# Altium PCB PCI Express_16765X6890_64PIN_Low profile_Clear.PCBDOC (part 5 of 9)
Units mm, origin at the board's own origin, x right, y up, seen from the top; angles counter-clockwise.
Board outline 80.71 x 137.84 mm, 6 copper layers (Top Layer, Layer 2 (GND), Layer 3, Layer 4, Layer 5 (AGND), Bottom Layer), stack 1.571 mm thick; 507 components, 297 nets, 1544 pads, 616 vias.
Unrouted connection lines stored in the file: 101.
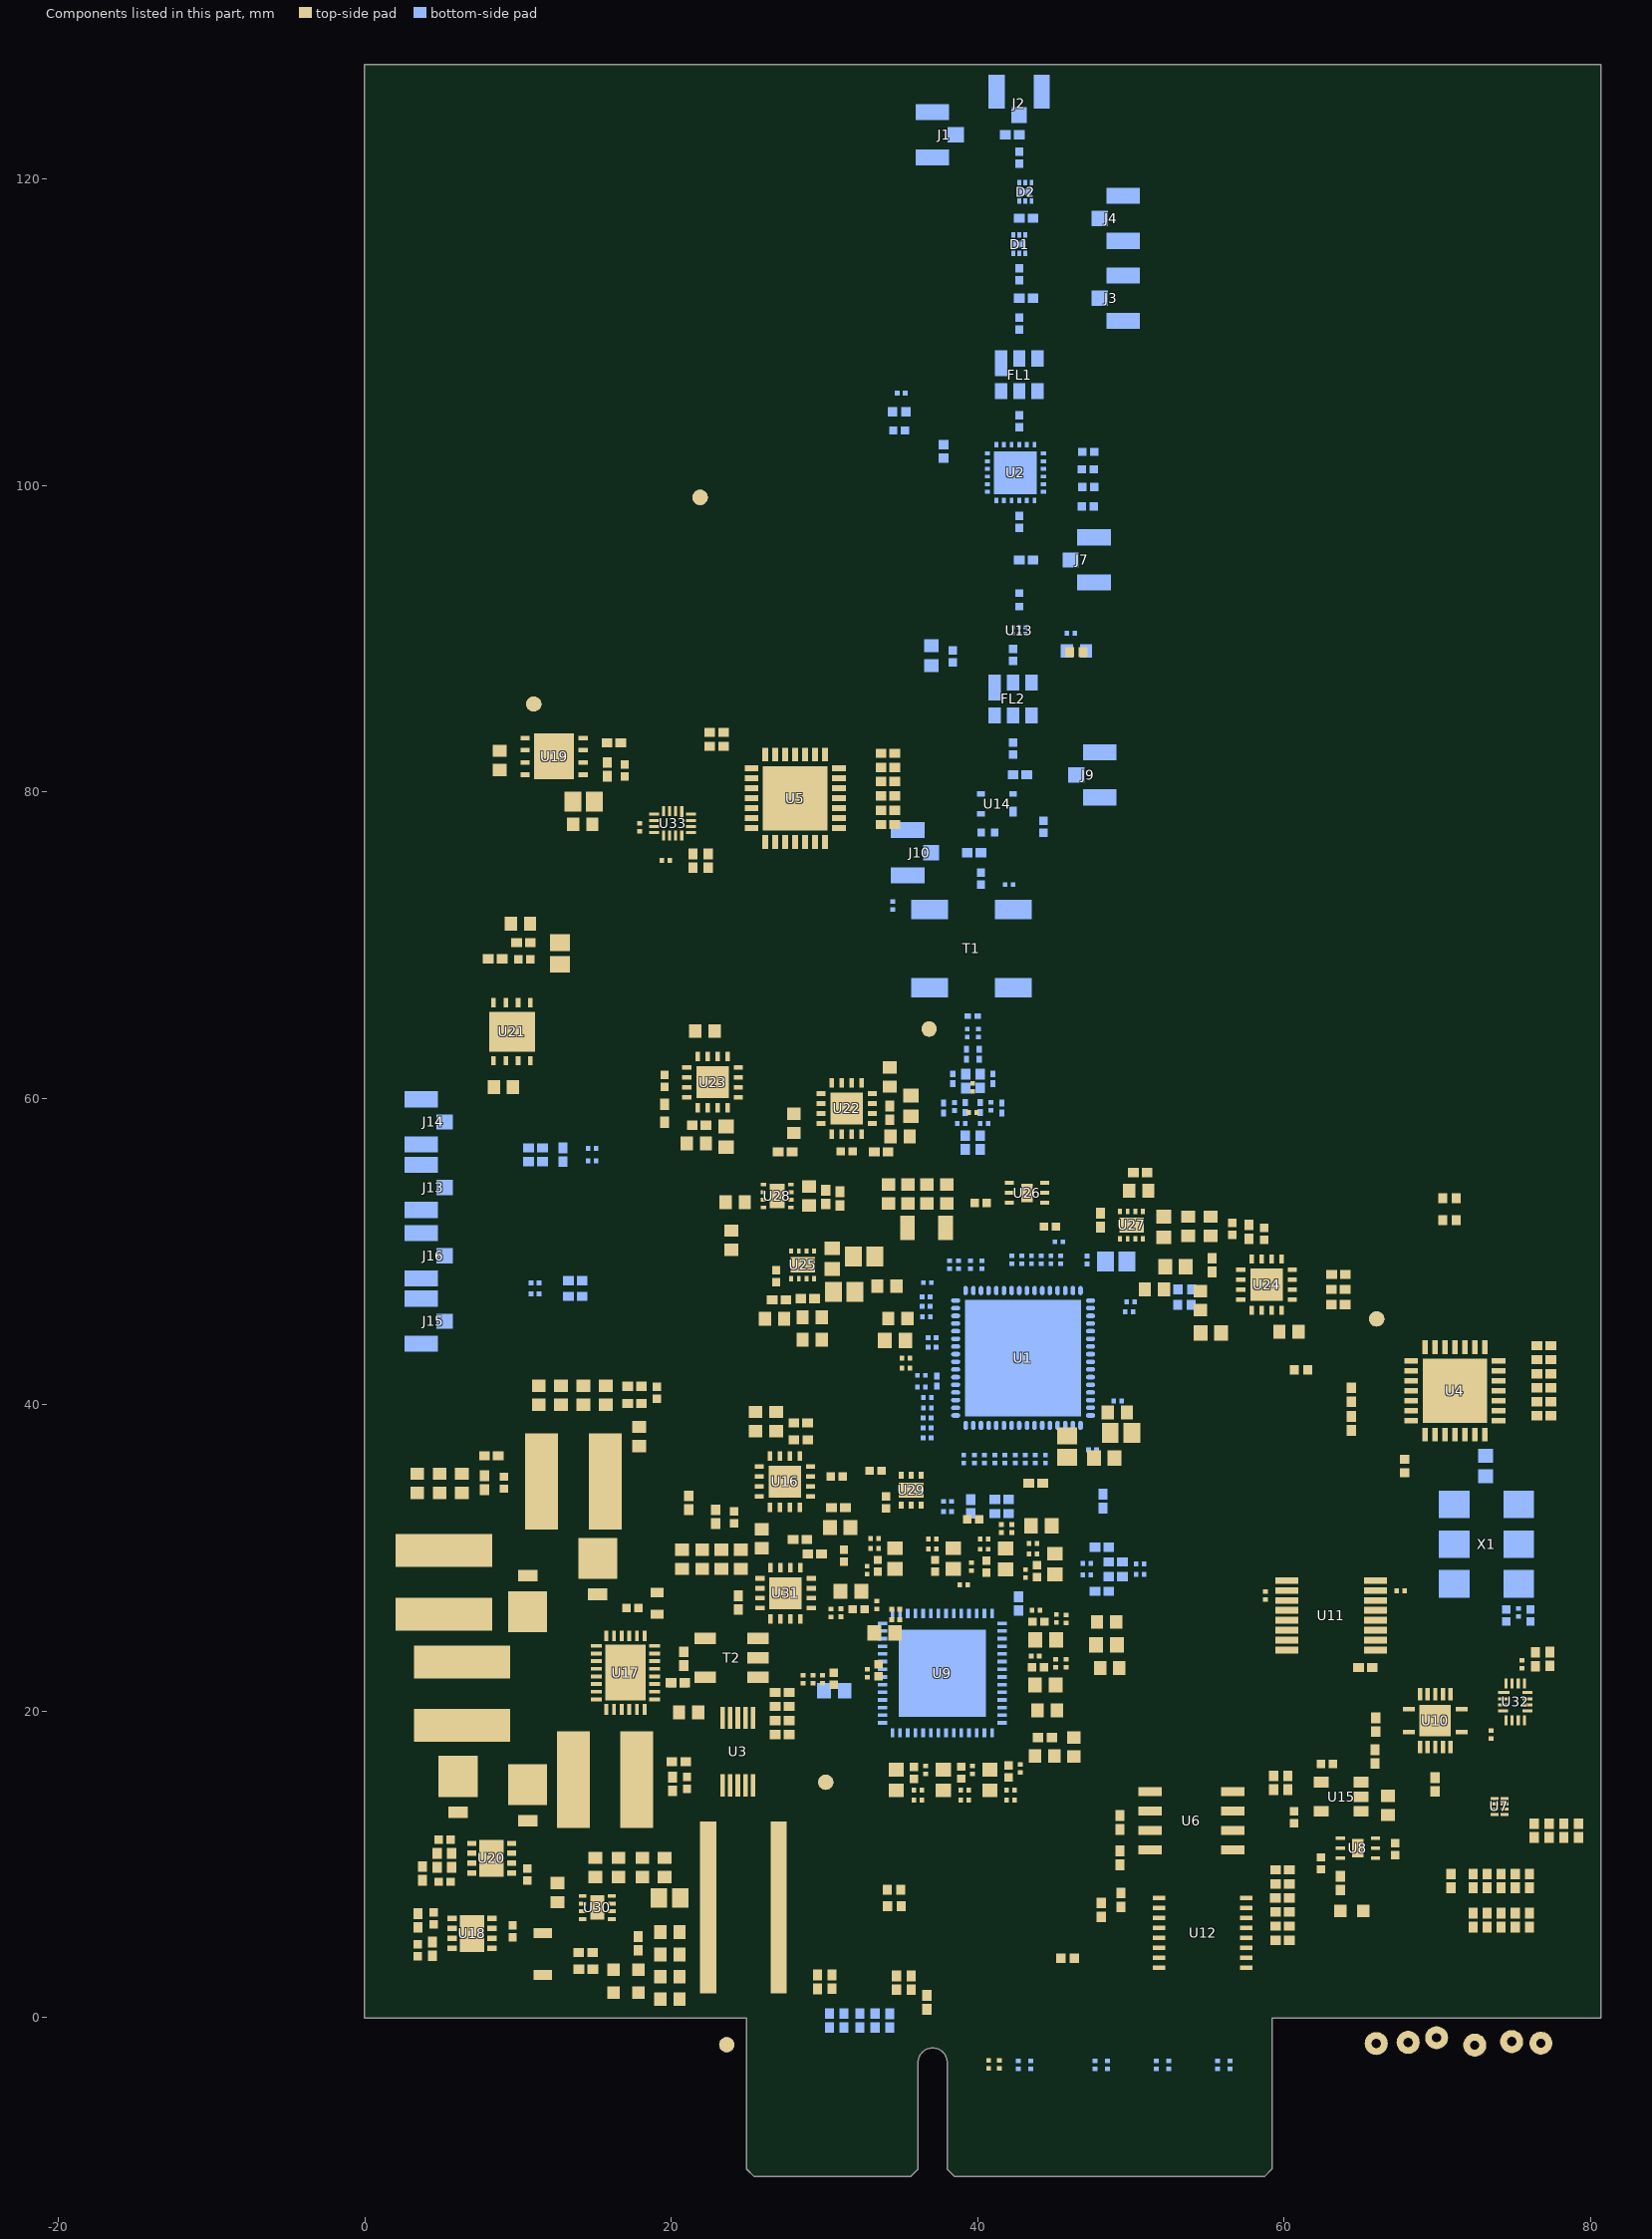
[diagram p4: the components of this part, seen from the top]

## Part data (continued)
R57: library part Resistor, Case/Package=0402, Case Code (Metric)=1005, Manufacturer 1=Susumu, Manufacturer Part Number 1=RR0510P-1822-D, Max Operating Temperature=125°C, Max Power Dissipation=63mW, Min Operating Temperature=-55°C, Package Quantity=1, Power Rating=62.5mW, Supplier Part Number 1=RR05P18.2KDCT-ND, Temperature Coefficient=25ppm/°C, Tolerance=0.5%, Voltage Rating=25V, Voltage Rating (DC)=50V, Case Code (Imperial)=0402, ComponentLink1Description=https://datasheet.ciiva.com/2494/rr-data-sheet-2494006.pdf?src-supplier=Digi-Key, ComponentLink1URL=https://datasheet.ciiva.com/2494/rr-data-sheet-2494006.pdf?src-supplier=Digi-Key, ComponentLink2Description=https://datasheet.ciiva.com/2494/rr-data-sheet-2494007.pdf?src-supplier=Digi-Key, ComponentLink2URL=https://datasheet.ciiva.com/2494/rr-data-sheet-2494007.pdf?src-supplier=Digi-Key, ComponentLink3Description=https://datasheet.ciiva.com/2494/rr-data-sheet-2494008.pdf?src-supplier=Digi-Key, ComponentLink3URL=https://datasheet.ciiva.com/2494/rr-data-sheet-2494008.pdf?src-supplier=Digi-Key, Composition="Thin Film", Height=0.016inch, Lead Free="Lead Free", Length=0.039inch, Number of Terminations=2, Packaging="Tape and Reel", Pricing 1="1=0.10000, 10=0.07400, 100=0.02850, 1000=0.01254, 2500=0.01083, 5000=0.00969 (USD)", Resistance=18.2kR, RoHS=Yes, Stock 1=48500, Supplier 1=Digi-Key, Termination=SMD/SMT, Width=0.02inch
R59: library part Resistor, Case/Package=0402, Case Code (Metric)=1005, Manufacturer 1=Panasonic, Manufacturer Part Number 1=ERA-2AEB6192X, Max Operating Temperature=155°C, Max Power Dissipation=63mW, Min Operating Temperature=-55°C, Package Quantity=1, Supplier Part Number 1=P61.9KDCCT-ND, Temperature Coefficient=25ppm/°C, Tolerance=0.1%, Voltage Rating=25V, Voltage Rating (DC)=50V, Case Code (Imperial)=0402, ComponentLink1Description=https://datasheet.ciiva.com/24058/aoa0000ce26-32660-24058744.pdf?src-supplier=Mouser, ComponentLink1URL=https://datasheet.ciiva.com/24058/aoa0000ce26-32660-24058744.pdf?src-supplier=Mouser, Composition="Thin Film,Metal Film", Contact Plating=Tin, Features="Automotive AEC-Q200", Height=0.016inch, Lead Free="Lead Free", Length=0.039inch, Mount="Surface Mount", Number of Terminations=2, Packaging="Tape and Reel", Power Rating=63mW, Pricing 1="1=0.45000, 10=0.32100, 100=0.12830, 1000=0.06322, 2500=0.05858, 5000=0.05300 (USD)", Radiation Hardening=No, REACH SVHC=Unknown, Resistance=61.9kR, RoHS=Yes, Stock 1=12743, Supplier 1=Digi-Key, Termination=SMD/SMT, Width=0.02inch
R60: library part Resistor, Case/Package=0402, Case Code (Metric)=1005, Manufacturer 1=Panasonic, Manufacturer Part Number 1=ERA-2AEB1052X, Max Operating Temperature=155°C, Max Power Dissipation=63mW, Min Operating Temperature=-55°C, Package Quantity=1, Supplier Part Number 1=P10.5KDCCT-ND, Temperature Coefficient=25ppm/°C, Tolerance=0.1%, Voltage Rating=25V, Voltage Rating (DC)=50V, Case Code (Imperial)=0402, ComponentLink1Description=http://www.mouser.com/ds/2/315/AOA0000CE26-32660.pdf?src-supplier=Mouser, ComponentLink1URL=http://www.mouser.com/ds/2/315/AOA0000CE26-32660.pdf?src-supplier=Mouser, ComponentLink2Description=https://media.digikey.com/pdf/Data%20Sheets/Panasonic%20Resistors%20Thermistors%20PDFs/ERA_Series_LE.pdf?src-supplier=Digi-Key, ComponentLink2URL=https://media.digikey.com/pdf/Data%20Sheets/Panasonic%20Resistors%20Thermistors%20PDFs/ERA_Series_LE.pdf?src-supplier=Digi-Key, ComponentLink3Description=http://www.onlinecomponents.com/datasheet/era-2aeb1052x.aspx?p=44473930&src-supplier=Onlinecomponents.com, ComponentLink3URL=http://www.onlinecomponents.com/datasheet/era-2aeb1052x.aspx?p=44473930&src-supplier=Onlinecomponents.com, ComponentLink4Description=http://www.farnell.com/datasheets/2052875.pdf?src-supplier=Newark, ComponentLink4URL=http://www.farnell.com/datasheets/2052875.pdf?src-supplier=Newark, ComponentLink5Description=https://industrial.panasonic.com/cdbs/www-data/pdf/RDM0000/AOA0000C307.pdf?src-supplier=Digi-Key, ComponentLink5URL=https://industrial.panasonic.com/cdbs/www-data/pdf/RDM0000/AOA0000C307.pdf?src-supplier=Digi-Key, Composition="Metal Film,Thin Film", Features="Automotive AEC-Q200", Height=0.016inch, Lead Free="Lead Free", Length=0.039inch, Mount="Surface Mount", Number of Terminations=2, Packaging="Tape and Reel", Power Rating=63mW, Pricing 1="1=0.45000, 10=0.32100, 100=0.12830, 1000=0.06322, 2500=0.05858, 5000=0.05300 (USD)", Resistance=10.5kR, RoHS=Yes, Stock 1=29203, Supplier 1=Digi-Key, Termination=SMD/SMT, Width=0.5mm
R61: library part Resistor, Case/Package=0402, Case Code (Metric)=1005, Manufacturer 1=Susumu, Manufacturer Part Number 1=RR0510P-4021-D, Max Operating Temperature=125°C, Max Power Dissipation=63mW, Min Operating Temperature=-55°C, Package Quantity=10000, Power Rating=62.5mW, Supplier Part Number 1=RR05P4.02KDCT-ND, Temperature Coefficient=25ppm/°C, Tolerance=0.5%, Voltage Rating=25V, Voltage Rating (DC)=50V, Case Code (Imperial)=0402, ComponentLink1Description=https://datasheet.ciiva.com/2494/rr-data-sheet-2494048.pdf?src-supplier=Digi-Key, ComponentLink1URL=https://datasheet.ciiva.com/2494/rr-data-sheet-2494048.pdf?src-supplier=Digi-Key, ComponentLink2Description=https://datasheet.ciiva.com/2494/rr-data-sheet-2494049.pdf?src-supplier=Digi-Key, ComponentLink2URL=https://datasheet.ciiva.com/2494/rr-data-sheet-2494049.pdf?src-supplier=Digi-Key, ComponentLink3Description=https://datasheet.ciiva.com/2494/rr-data-sheet-2494050.pdf?src-supplier=Digi-Key, ComponentLink3URL=https://datasheet.ciiva.com/2494/rr-data-sheet-2494050.pdf?src-supplier=Digi-Key, Composition="Thin Film", Height=0.016inch, Lead Free="Lead Free", Length=0.039inch, Number of Terminations=2, Packaging="Tape and Reel", Pricing 1="1=0.10000, 10=0.07400, 100=0.02850, 1000=0.01254, 2500=0.01083, 5000=0.00969 (USD)", Resistance=4.02kR, RoHS=Yes, Stock 1=40212, Supplier 1=Digi-Key, Termination=SMD/SMT, Width=0.02inch
R62 R64 R100: library part Resistor, Case/Package=0402, Case Code (Metric)=1005, Manufacturer 1=Susumu, Manufacturer Part Number 1=RR0510P-102-D, Max Operating Temperature=125°C, Max Power Dissipation=63mW, Min Operating Temperature=-55°C, Package Quantity=1, Supplier Part Number 1=RR05P1.0KDCT-ND, Temperature Coefficient=25ppm/°C, Tolerance=0.5%, Voltage Rating=25V, Case Code (Imperial)=0402, ComponentLink1Description=https://datasheet.ciiva.com/2486/rr-data-sheet-2486776.pdf?src-supplier=Digi-Key, ComponentLink1URL=https://datasheet.ciiva.com/2486/rr-data-sheet-2486776.pdf?src-supplier=Digi-Key, ComponentLink2Description=https://datasheet.ciiva.com/2486/rr-data-sheet-2486777.pdf?src-supplier=Digi-Key, ComponentLink2URL=https://datasheet.ciiva.com/2486/rr-data-sheet-2486777.pdf?src-supplier=Digi-Key, ComponentLink3Description=https://datasheet.ciiva.com/2486/rr-data-sheet-2486778.pdf?src-supplier=Digi-Key, ComponentLink3URL=https://datasheet.ciiva.com/2486/rr-data-sheet-2486778.pdf?src-supplier=Digi-Key, ComponentLink4Description=https://datasheet.ciiva.com/7984/1581132-7984302.pdf?src-supplier=Element14, ComponentLink4URL=https://datasheet.ciiva.com/7984/1581132-7984302.pdf?src-supplier=Element14, Composition="Thin Film", Height=0.016inch, Lead Free="Lead Free", Length=0.039inch, Number of Pins=2, Number of Terminations=2, Packaging="Tape and Reel", Power Rating=63mW, Pricing 1="1=0.10000, 10=0.07400, 100=0.02850, 1000=0.01254, 2500=0.01083, 5000=0.00969 (USD)", REACH SVHC=Unknown, Resistance=1kR, RoHS=Yes, Stock 1=1157935, Supplier 1=Digi-Key, Termination=SMD/SMT, Voltage Rating (DC)=25V, Width=0.02inch
R63: library part Resistor, Case/Package=0402, Case Code (Metric)=1005, Manufacturer 1="Stackpole Electronics", Manufacturer Part Number 1=RMCF0402FT1K80, Max Operating Temperature=155°C, Max Power Dissipation=63mW, Min Operating Temperature=-55°C, Supplier Part Number 1=RMCF0402FT1K80CT-ND, Temperature Coefficient=100ppm/°C, Tolerance=1%, Case Code (Imperial)=0402, ComponentLink1Description=https://www.seielect.com/catalog/SEI-Packaging.pdf?src-supplier=Digi-Key, ComponentLink1URL=https://www.seielect.com/catalog/SEI-Packaging.pdf?src-supplier=Digi-Key, ComponentLink2Description=https://www.seielect.com/Catalog/SEI-RMCF_RMCP.pdf?src-supplier=Digi-Key, ComponentLink2URL=https://www.seielect.com/Catalog/SEI-RMCF_RMCP.pdf?src-supplier=Digi-Key, ComponentLink3Description=https://www.seielect.com/Catalog/SEI-RMCF_RMCP.pdf?src-supplier=Avnet, ComponentLink3URL=https://www.seielect.com/Catalog/SEI-RMCF_RMCP.pdf?src-supplier=Avnet, Composition="Thick Film", Contact Plating=Tin,Matte, Features="Automotive AEC-Q200", Height=0.016inch, Lead Free="Lead Free", Length=0.039inch, Mount="Surface Mount", Number of Terminations=2, Packaging="Cut Tape", Pricing 1="1=0.10000, 10=0.01500, 100=0.00610, 1000=0.00275, 2500=0.00239, 5000=0.00198 (USD)", Resistance=1.8kR, RoHS=Yes, Stock 1=126808, Supplier 1=Digi-Key, Width=0.02inch
R67 R69: library part Resistor, Case/Package=0402, Case Code (Metric)=1005, Manufacturer 1=Susumu, Manufacturer Part Number 1=RR0510P-152-D, Max Operating Temperature=125°C, Max Power Dissipation=63mW, Min Operating Temperature=-55°C, Package Quantity=10000, Supplier Part Number 1=RR05P1.5KDCT-ND, Temperature Coefficient=25ppm/°C, Tolerance=0.5%, Voltage Rating=25V, Case Code (Imperial)=0402, ComponentLink1Description=https://datasheet.ciiva.com/2486/rr-data-sheet-2486848.pdf?src-supplier=Digi-Key, ComponentLink1URL=https://datasheet.ciiva.com/2486/rr-data-sheet-2486848.pdf?src-supplier=Digi-Key, ComponentLink2Description=https://datasheet.ciiva.com/2486/rr-data-sheet-2486849.pdf?src-supplier=Digi-Key, ComponentLink2URL=https://datasheet.ciiva.com/2486/rr-data-sheet-2486849.pdf?src-supplier=Digi-Key, ComponentLink3Description=https://datasheet.ciiva.com/2486/rr-data-sheet-2486850.pdf?src-supplier=Digi-Key, ComponentLink3URL=https://datasheet.ciiva.com/2486/rr-data-sheet-2486850.pdf?src-supplier=Digi-Key, Composition="Thin Film", Height=0.016inch, Lead Free="Lead Free", Length=0.039inch, Number of Pins=2, Number of Terminations=2, Packaging="Tape and Reel", Power Rating=63mW, Pricing 1="1=0.10000, 10=0.07400, 100=0.02850, 1000=0.01254, 2500=0.01083, 5000=0.00969 (USD)", REACH SVHC="No SVHC", Resistance=1.5kR, RoHS=Yes, Stock 1=197689, Supplier 1=Digi-Key, Termination=SMD/SMT, Voltage Rating (DC)=25V, Width=0.02inch, Working Voltage=25V
R68 R70: library part Resistor, Case/Package=0402, Case Code (Metric)=1005, Manufacturer 1="Vishay Dale", Manufacturer Part Number 1=CRCW04021K00DHEDP, Max Operating Temperature=155°C, Max Power Dissipation=63mW, Min Operating Temperature=-55°C, Package Quantity=1, Supplier Part Number 1=541-1.0KAVCT-ND, Temperature Coefficient=50ppm/°C, Tolerance=0.5%, Case Code (Imperial)=0402, ComponentLink1Description=https://datasheet.ciiva.com/6544/dcrcwpe3-6544918.pdf?src-supplier=Digi-Key, ComponentLink1URL=https://datasheet.ciiva.com/6544/dcrcwpe3-6544918.pdf?src-supplier=Digi-Key, Composition="Thick Film", Depth=0.5mm, Features="Automotive AEC-Q200", Height=0.016inch, Length=0.039inch, Military Standard=Not, Number of Terminations=2, Packaging="Tape and Reel", Pricing 1="1=0.30000, 10=0.25400, 100=0.09930, 1000=0.04158, 2500=0.03812, 5000=0.03465 (USD)", Resistance=1kR, RoHS=Yes, Stock 1=37274, Supplier 1=Digi-Key, Width=0.02inch
R71 R73: library part Resistor, Case/Package=0402, Case Code (Metric)=1005, Manufacturer 1=Panasonic, Manufacturer Part Number 1=ERA-2AEB4991X, Max Operating Temperature=155°C, Max Power Dissipation=63mW, Min Operating Temperature=-55°C, Package Quantity=1, Power Rating=62.5mW, Supplier Part Number 1=P4.99KDCCT-ND, Temperature Coefficient=25ppm/°C, Tolerance=0.1%, Voltage Rating=50V, Case Code (Imperial)=0402, ComponentLink1Description=https://datasheet.ciiva.com/30094/54aoa0000ce26-30094171.pdf?src-supplier=Onlinecomponents.com, ComponentLink1URL=https://datasheet.ciiva.com/30094/54aoa0000ce26-30094171.pdf?src-supplier=Onlinecomponents.com, Composition="Thin Film", Features="Automotive AEC-Q200", Height=0.016inch, Lead Free="Lead Free", Length=0.039inch, Mount="Surface Mount", Number of Terminations=2, Packaging="Tape and Reel", Pricing 1="1=0.45000, 10=0.32100, 100=0.12830, 1000=0.06322, 2500=0.05858, 5000=0.05300 (USD)", REACH SVHC=Unknown, Resistance=4.99kR, RoHS=Yes, Stock 1=156122, Supplier 1=Digi-Key, Voltage Rating (DC)=50V, Width=0.02inch
R72 R74: library part Resistor, Case/Package=0402, Case Code (Metric)=1005, Manufacturer 1=Panasonic, Manufacturer Part Number 1=ERA-2AEB3321X, Max Operating Temperature=155°C, Max Power Dissipation=63mW, Min Operating Temperature=-55°C, Package Quantity=10000, Supplier Part Number 1=P3.32KDCCT-ND, Temperature Coefficient=25ppm/°C, Tolerance=0.1%, Voltage Rating=25V, Voltage Rating (DC)=50V, Case Code (Imperial)=0402, ComponentLink1Description=http://components.arrow.com/part/dataview/0323_02923244?src-supplier=Arrow+Europe, ComponentLink1URL=http://components.arrow.com/part/dataview/0323_02923244?src-supplier=Arrow+Europe, ComponentLink2Description=http://www.mouser.com/ds/2/315/AOA0000C237-1100991.pdf?src-supplier=Mouser, ComponentLink2URL=http://www.mouser.com/ds/2/315/AOA0000C237-1100991.pdf?src-supplier=Mouser, ComponentLink3Description=https://industrial.panasonic.com/cdbs/www-data/pdf/RDM0000/AOA0000C307.pdf?src-supplier=Digi-Key, ComponentLink3URL=https://industrial.panasonic.com/cdbs/www-data/pdf/RDM0000/AOA0000C307.pdf?src-supplier=Digi-Key, ComponentLink4Description=http://www.farnell.com/datasheets/2052875.pdf?src-supplier=Newark, ComponentLink4URL=http://www.farnell.com/datasheets/2052875.pdf?src-supplier=Newark, ComponentLink5Description=http://www.onlinecomponents.com/datasheet/era-2aeb3321x.aspx?p=44473698&src-supplier=Onlinecomponents.com, ComponentLink5URL=http://www.onlinecomponents.com/datasheet/era-2aeb3321x.aspx?p=44473698&src-supplier=Onlinecomponents.com, ComponentLink6Description=http://www.farnell.com/datasheets/1818319.pdf?src-supplier=Element14, ComponentLink6URL=http://www.farnell.com/datasheets/1818319.pdf?src-supplier=Element14, Composition="Thin Film,Metal Film", Depth=0.5mm, Features="Automotive AEC-Q200", Height=0.016inch, Lead Free="Lead Free", Length=1mm, Military Standard=Not, Mount="Surface Mount", Number of Terminations=2, Packaging="Tape and Reel", Power Rating=63mW, Pricing 1="1=0.45000, 10=0.32100, 100=0.12830, 1000=0.06322, 2500=0.05858, 5000=0.05300 (USD)", REACH SVHC=Unknown, Resistance=3.32kR, RoHS=Yes, Stock 1=29723, Supplier 1=Digi-Key, Width=0.02inch
R75: library part Resistor, Case/Package=0402, Case Code (Metric)=1005, Manufacturer 1=Yageo, Manufacturer Part Number 1=AC0402FR-0756KL, Max Operating Temperature=155°C, Max Power Dissipation=63mW, Min Operating Temperature=-55°C, Supplier Part Number 1=YAG3501CT-ND, Temperature Coefficient=100ppm/°C, Tolerance=1%, Case Code (Imperial)=0402, ComponentLink1Description=http://www.yageo.com/documents/recent/PYu-AC_51_RoHS_L_2_revised.pdf?src-supplier=Future+Electronics, ComponentLink1URL=http://www.yageo.com/documents/recent/PYu-AC_51_RoHS_L_2_revised.pdf?src-supplier=Future+Electronics, ComponentLink2Description=http://www.yageo.com/NewPortal/yageodocoutput?fileName=/pdf/R-Chip/PYu-AC_51_RoHS_L_6.pdf&src-supplier=Digi-Key, ComponentLink2URL=http://www.yageo.com/NewPortal/yageodocoutput?fileName=/pdf/R-Chip/PYu-AC_51_RoHS_L_6.pdf&src-supplier=Digi-Key, Composition="Thick Film", Features="Moisture Resistant,Automotive AEC-Q200", Height=0.015inch, Lead Free="Lead Free", Length=0.039inch, Number of Terminations=2, Packaging="Tape and Reel", Power Rating=63mW, Pricing 1="1=0.10000, 10=0.02200, 100=0.00900, 1000=0.00403, 2500=0.00350, 5000=0.00289 (USD)", Resistance=56kR, RoHS=Yes, Stock 1=69752, Supplier 1=Digi-Key, Width=0.02inch
R76: library part Resistor, Case/Package=0402, Case Code (Metric)=1005, Manufacturer 1=Yageo, Manufacturer Part Number 1=RC0402FR-0710KL, Max Operating Temperature=155°C, Min Operating Temperature=-55°C, Power Rating=62.5mW, Supplier Part Number 1=311-10.0KLRCT-ND, Temperature Coefficient=100ppm/°C, Tolerance=1%, Voltage Rating=50V, Case Code (Imperial)=0402, ComponentLink1Description=https://datasheet.ciiva.com/7660/38568-7660787.pdf?src-supplier=Element14, ComponentLink1URL=https://datasheet.ciiva.com/7660/38568-7660787.pdf?src-supplier=Element14, ComponentLink2Description=https://datasheet.ciiva.com/7849/1784430-7849813.pdf?src-supplier=Element14, ComponentLink2URL=https://datasheet.ciiva.com/7849/1784430-7849813.pdf?src-supplier=Element14, ComponentLink3Description=https://datasheet.ciiva.com/7849/1686128-7849814.pdf?src-supplier=Element14, ComponentLink3URL=https://datasheet.ciiva.com/7849/1686128-7849814.pdf?src-supplier=Element14, ComponentLink4Description=https://datasheet.ciiva.com/7849/1784430-7849815.pdf?src-supplier=Element14, ComponentLink4URL=https://datasheet.ciiva.com/7849/1784430-7849815.pdf?src-supplier=Element14, ComponentLink5Description=https://datasheet.ciiva.com/22747/1018594-22747512.pdf?src-supplier=Element14, ComponentLink5URL=https://datasheet.ciiva.com/22747/1018594-22747512.pdf?src-supplier=Element14, ComponentLink6Description=https://datasheet.ciiva.com/12667/pyu-rc0402-51-rohs-l-6-r-12667067.pdf?src-supplier=Mouser, ComponentLink6URL=https://datasheet.ciiva.com/12667/pyu-rc0402-51-rohs-l-6-r-12667067.pdf?src-supplier=Mouser, ComponentLink7Description=https://datasheet.ciiva.com/7983/1018594-7983486.pdf?src-supplier=Element14, ComponentLink7URL=https://datasheet.ciiva.com/7983/1018594-7983486.pdf?src-supplier=Element14, Composition="Thick Film", Depth=0.5mm, Height=0.32mm, Lead Free="Lead Free", Lead Pitch=0.2mm, Length=1mm, Military Standard=Not, Number of Pins=2, Number of Terminations=2, Packaging="Tape and Reel", Pricing 1="1=0.10000, 10=0.01500, 100=0.00630, 1000=0.00281, 2500=0.00244, 5000=0.00201 (USD)", REACH SVHC="No SVHC", Resistance=10kR, RoHS=Yes, Stock 1=77736196, Supplier 1=Digi-Key, Termination=SMD/SMT, Voltage Rating (DC)=50V, Width=0.5mm, Working Voltage=50V
R80 R82: library part Resistor, Case/Package=0402, Case Code (Metric)=1005, Manufacturer 1=Panasonic, Manufacturer Part Number 1=ERA-2AED753X, Max Operating Temperature=155°C, Max Power Dissipation=63mW, Min Operating Temperature=-55°C, Package Quantity=1, Supplier Part Number 1=P75KDECT-ND, Temperature Coefficient=25ppm/°C, Tolerance=0.5%, Voltage Rating=25V, Case Code (Imperial)=0402, ComponentLink1Description=https://datasheet.ciiva.com/9187/aoa0000ce26-9187754.pdf?src-supplier=Avnet, ComponentLink1URL=https://datasheet.ciiva.com/9187/aoa0000ce26-9187754.pdf?src-supplier=Avnet, Composition="Thin Film,Metal Film", Contact Plating=Tin, Features="Automotive AEC-Q200", Height=0.016inch, Lead Free="Lead Free", Length=0.039inch, Mount="Surface Mount", Number of Terminations=2, Packaging="Tape and Reel", Power Rating=63mW, Pricing 1="1=0.22000, 10=0.18800, 100=0.07350, 1000=0.03077, 2500=0.02820, 5000=0.02564 (USD)", Resistance=75kR, RoHS=Yes, Stock 1=38844, Supplier 1=Digi-Key, Width=0.02inch
R81 R85: library part Resistor, Case/Package=0402, Case Code (Metric)=1005, Manufacturer 1=Panasonic, Manufacturer Part Number 1=ERA-2AEB1072X, Max Operating Temperature=155°C, Max Power Dissipation=63mW, Min Operating Temperature=-55°C, Package Quantity=1, Supplier Part Number 1=P10.7KDCCT-ND, Temperature Coefficient=25ppm/°C, Tolerance=0.1%, Voltage Rating=25V, Voltage Rating (DC)=50V, Case Code (Imperial)=0402, ComponentLink1Description=https://datasheet.ciiva.com/24064/aoa0000ce26-32660-24064664.pdf?src-supplier=Mouser, ComponentLink1URL=https://datasheet.ciiva.com/24064/aoa0000ce26-32660-24064664.pdf?src-supplier=Mouser, Composition="Thin Film,Metal Film", Depth=0.5mm, Features="Automotive AEC-Q200", Height=0.016inch, Lead Free="Lead Free", Length=1mm, Military Standard=Not, Mount="Surface Mount", Number of Terminations=2, Packaging="Tape and Reel", Power Rating=63mW, Pricing 1="1=0.45000, 10=0.32100, 100=0.12830, 1000=0.06322, 2500=0.05858, 5000=0.05300 (USD)", REACH SVHC=Unknown, Resistance=10.7kR, RoHS=Yes, Stock 1=79156, Supplier 1=Digi-Key, Termination=SMD/SMT, Width=0.02inch
R83 R103 R110: library part Resistor, Case/Package=0402, Case Code (Metric)=1005, Manufacturer 1=Panasonic, Manufacturer Part Number 1=ERA-2AED104X, Max Operating Temperature=155°C, Max Power Dissipation=63mW, Min Operating Temperature=-55°C, Package Quantity=10000, Supplier Part Number 1=P100KDECT-ND, Temperature Coefficient=25ppm/°C, Tolerance=0.5%, Voltage Rating=25V, Case Code (Imperial)=0402, ComponentLink1Description=https://datasheet.ciiva.com/24028/aoa0000ce26-197354-24028150.pdf?src-supplier=Mouser, ComponentLink1URL=https://datasheet.ciiva.com/24028/aoa0000ce26-197354-24028150.pdf?src-supplier=Mouser, ComponentLink2Description=https://datasheet.ciiva.com/43470/1776116-43470438.pdf?src-supplier=Farnell, ComponentLink2URL=https://datasheet.ciiva.com/43470/1776116-43470438.pdf?src-supplier=Farnell, ComponentLink3Description=https://datasheet.ciiva.com/7830/1776116-7830920.pdf?src-supplier=Element14, ComponentLink3URL=https://datasheet.ciiva.com/7830/1776116-7830920.pdf?src-supplier=Element14, ComponentLink4Description=https://datasheet.ciiva.com/46378/1776116-46378234.pdf?src-supplier=Element14, ComponentLink4URL=https://datasheet.ciiva.com/46378/1776116-46378234.pdf?src-supplier=Element14, ComponentLink5Description=https://datasheet.ciiva.com/16780/70068849-16780139.pdf?src-supplier=Allied+Electronics, ComponentLink5URL=https://datasheet.ciiva.com/16780/70068849-16780139.pdf?src-supplier=Allied+Electronics, ComponentLink6Description=https://datasheet.ciiva.com/9117/aoa0000ce26-9117229.pdf?src-supplier=Avnet, ComponentLink6URL=https://datasheet.ciiva.com/9117/aoa0000ce26-9117229.pdf?src-supplier=Avnet, ComponentLink7Description=https://datasheet.ciiva.com/16511/aoa0000ce26-16511566.pdf?src-supplier=Avnet+Asia, ComponentLink7URL=https://datasheet.ciiva.com/16511/aoa0000ce26-16511566.pdf?src-supplier=Avnet+Asia, ComponentLink8Description=https://datasheet.ciiva.com/30225/54aoa0000ce26-30225311.pdf?src-supplier=Onlinecomponents.com, ComponentLink8URL=https://datasheet.ciiva.com/30225/54aoa0000ce26-30225311.pdf?src-supplier=Onlinecomponents.com, Composition="Metal Film,Thin Film", Contact Plating=Tin, Depth=0.5mm, Height=0.016inch, Lead Free="Lead Free", Length=1mm, Military Standard=Not, Mount="Surface Mount", Number of Terminations=2, Packaging="Tape and Reel", Power Rating=63mW, Pricing 1="1=0.22000, 10=0.18800, 100=0.07350, 1000=0.03077, 2500=0.02820, 5000=0.02564 (USD)", Radiation Hardening=No, REACH SVHC="No SVHC", Resistance=100kR, RoHS=Yes, Stock 1=54338, Supplier 1=Digi-Key, Termination=SMD/SMT, Voltage Rating (DC)=25V, Width=0.5mm
R87 R95: library part Resistor, Case/Package=0402, Case Code (Metric)=1005, Manufacturer 1=Yageo, Manufacturer Part Number 1=RC0402FR-07100RL, Max Operating Temperature=155°C, Min Operating Temperature=-55°C, Power Rating=62.5mW, Supplier Part Number 1=311-100LRCT-ND, Temperature Coefficient=100ppm/°C, Tolerance=1%, Voltage Rating=50V, Case Code (Imperial)=0402, ComponentLink1Description=https://datasheet.ciiva.com/7849/1784430-7849810.pdf?src-supplier=Element14, ComponentLink1URL=https://datasheet.ciiva.com/7849/1784430-7849810.pdf?src-supplier=Element14, ComponentLink2Description=https://datasheet.ciiva.com/11808/0900766b80c66297-11808765.pdf?src-supplier=RSComponents, ComponentLink2URL=https://datasheet.ciiva.com/11808/0900766b80c66297-11808765.pdf?src-supplier=RSComponents, ComponentLink3Description=https://datasheet.ciiva.com/12667/pyu-rc0402-51-rohs-l-6-r-12667957.pdf?src-supplier=Mouser, ComponentLink3URL=https://datasheet.ciiva.com/12667/pyu-rc0402-51-rohs-l-6-r-12667957.pdf?src-supplier=Mouser, ComponentLink4Description=https://datasheet.ciiva.com/16740/pyu-rc0402-51-rohs-l-6-r-16740566.pdf?src-supplier=Future+Electronics, ComponentLink4URL=https://datasheet.ciiva.com/16740/pyu-rc0402-51-rohs-l-6-r-16740566.pdf?src-supplier=Future+Electronics, ComponentLink5Description=https://datasheet.ciiva.com/15189/getdatasheetpartid-329466-15189335.pdf?src-supplier=Verical, ComponentLink5URL=https://datasheet.ciiva.com/15189/getdatasheetpartid-329466-15189335.pdf?src-supplier=Verical, ComponentLink6Description=https://datasheet.ciiva.com/22747/1018594-22747511.pdf?src-supplier=Element14, ComponentLink6URL=https://datasheet.ciiva.com/22747/1018594-22747511.pdf?src-supplier=Element14, ComponentLink7Description=https://datasheet.ciiva.com/28367/1018594-28367226.pdf?src-supplier=Element14, ComponentLink7URL=https://datasheet.ciiva.com/28367/1018594-28367226.pdf?src-supplier=Element14, Composition="Thick Film", Depth=0.5mm, Height=0.32mm, Lead Free="Lead Free", Length=1mm, Military Standard=Not, Number of Pins=2, Packaging="Tape and Reel", Pricing 1="1=0.10000, 10=0.01600, 100=0.00640, 1000=0.00286, 2500=0.00248, 5000=0.00205 (USD)", REACH SVHC="No SVHC", Resistance=100R, RoHS=Yes, Stock 1=45915826, Supplier 1=Digi-Key, Termination=SMD/SMT, Voltage Rating (DC)=50V, Width=0.5mm
R88: library part Resistor, Case/Package=0402, Case Code (Metric)=1005, Manufacturer 1=Yageo, Manufacturer Part Number 1=RT0402DRE0738K3L, Max Operating Temperature=155°C, Max Power Dissipation=63mW, Min Operating Temperature=-55°C, Supplier Part Number 1=311-2278-1-ND, Temperature Coefficient=50ppm/°C, Tolerance=0.5%, Voltage Rating (DC)=50V, Case Code (Imperial)=0402, ComponentLink1Description=http://www.yageo.com/documents/recent/PYu-RT_1-to-0.01_RoHS_L_9.pdf?src-supplier=Digi-Key, ComponentLink1URL=http://www.yageo.com/documents/recent/PYu-RT_1-to-0.01_RoHS_L_9.pdf?src-supplier=Digi-Key, ComponentLink2Description=http://www.yageo.com/documents/recent/PYu-RT_1-to-0.05_RoHS_L_(4).pdf?src-supplier=Future+Electronics, ComponentLink2URL=http://www.yageo.com/documents/recent/PYu-RT_1-to-0.05_RoHS_L_(4).pdf?src-supplier=Future+Electronics, Composition="Thin Film", Features="Moisture Resistant", Height=0.014inch, Lead Free="Lead Free", Length=0.039inch, Number of Terminations=2, Packaging="Tape and Reel", Power Rating=63mW, Pricing 1="1=0.20000, 10=0.16700, 100=0.06510, 1000=0.02725, 2500=0.02498, 5000=0.02271 (USD)", Resistance=38.3kR, RoHS=Yes, Stock 1=29643, Supplier 1=Digi-Key, Width=0.02inch
R102 R106 R107 R108 R109: library part Resistor, Case/Package=0402, Case Code (Metric)=1005, Manufacturer 1=Yageo, Manufacturer Part Number 1=RC0402FR-07100KL, Max Operating Temperature=155°C, Max Power Dissipation=63mW, Min Operating Temperature=-55°C, Package Quantity=1, Supplier Part Number 1=311-100KLRCT-ND, Temperature Coefficient=100ppm/°C, Tolerance=1%, Voltage Rating=50V, Case Code (Imperial)=0402, ComponentLink1Description=https://datasheet.ciiva.com/11819/0900766b80c66297-11819452.pdf?src-supplier=RSComponents, ComponentLink1URL=https://datasheet.ciiva.com/11819/0900766b80c66297-11819452.pdf?src-supplier=RSComponents, ComponentLink2Description=https://datasheet.ciiva.com/2453/pyu-r-int-thick-7-2453361.pdf?src-supplier=Digi-Key, ComponentLink2URL=https://datasheet.ciiva.com/2453/pyu-r-int-thick-7-2453361.pdf?src-supplier=Digi-Key, ComponentLink3Description=https://datasheet.ciiva.com/2453/pyu-r-int-thick-7-2453362.pdf?src-supplier=Digi-Key, ComponentLink3URL=https://datasheet.ciiva.com/2453/pyu-r-int-thick-7-2453362.pdf?src-supplier=Digi-Key, ComponentLink4Description=https://datasheet.ciiva.com/2453/pyu-r-int-thick-7-2453363.pdf?src-supplier=Digi-Key, ComponentLink4URL=https://datasheet.ciiva.com/2453/pyu-r-int-thick-7-2453363.pdf?src-supplier=Digi-Key, ComponentLink5Description=https://datasheet.ciiva.com/22747/1018594-22747509.pdf?src-supplier=Element14, ComponentLink5URL=https://datasheet.ciiva.com/22747/1018594-22747509.pdf?src-supplier=Element14, ComponentLink6Description=https://datasheet.ciiva.com/15189/getdatasheetpartid-323696-15189334.pdf?src-supplier=Verical, ComponentLink6URL=https://datasheet.ciiva.com/15189/getdatasheetpartid-323696-15189334.pdf?src-supplier=Verical, ComponentLink7Description=https://datasheet.ciiva.com/12667/pyu-rc0402-51-rohs-l-6-r-12667930.pdf?src-supplier=Mouser, ComponentLink7URL=https://datasheet.ciiva.com/12667/pyu-rc0402-51-rohs-l-6-r-12667930.pdf?src-supplier=Mouser, Composition="Thick Film", Depth=0.5mm, Features="Moisture Resistant", Height=0.016inch, Lead Free="Lead Free", Length=0.039inch, Military Standard=Not, Number of Terminations=2, Packaging="Tape and Reel", Power Rating=63mW, Pricing 1="1=0,10000, 10=0,01500, 100=0,00600, 1000=0,00270, 2500=0,00235, 5000=0,00194 (USD)", REACH SVHC="No SVHC", Resistance=100kR, RoHS=Yes, Stock 1=51358973, Supplier 1=Digi-Key, Termination=SMD/SMT, Width=0.02inch, Working Voltage=50V
R132: library part Resistor, Case/Package=0402, Case Code (Metric)=1005, Manufacturer 1=Vishay, Manufacturer Part Number 1=CRCW0402120RFKED, Max Operating Temperature=155°C, Max Power Dissipation=63mW, Min Operating Temperature=-55°C, Package Quantity=10000, Supplier Part Number 1=541-120LCT-ND, Temperature Coefficient=100ppm/°C, Tolerance=1%, Voltage Rating=50V, Case Code (Imperial)=0402, ComponentLink1Description=https://datasheet.ciiva.com/11817/0900766b80d98824-11817989.pdf?src-supplier=RSComponents, ComponentLink1URL=https://datasheet.ciiva.com/11817/0900766b80d98824-11817989.pdf?src-supplier=RSComponents, ComponentLink2Description=https://datasheet.ciiva.com/2463/dcrcwe3-2463109.pdf?src-supplier=Digi-Key, ComponentLink2URL=https://datasheet.ciiva.com/2463/dcrcwe3-2463109.pdf?src-supplier=Digi-Key, ComponentLink3Description=https://datasheet.ciiva.com/8336/dcrcwe3-8336661.pdf?src-supplier=Avnet, ComponentLink3URL=https://datasheet.ciiva.com/8336/dcrcwe3-8336661.pdf?src-supplier=Avnet, ComponentLink4Description=https://datasheet.ciiva.com/2463/dcrcwe3-2463110.pdf?src-supplier=Digi-Key, ComponentLink4URL=https://datasheet.ciiva.com/2463/dcrcwe3-2463110.pdf?src-supplier=Digi-Key, ComponentLink5Description=https://datasheet.ciiva.com/5550/dcrcwe3-109170-5550502.pdf?src-supplier=Mouser, ComponentLink5URL=https://datasheet.ciiva.com/5550/dcrcwe3-109170-5550502.pdf?src-supplier=Mouser, ComponentLink6Description=https://datasheet.ciiva.com/2463/dcrcwe3-2463111.pdf?src-supplier=Digi-Key, ComponentLink6URL=https://datasheet.ciiva.com/2463/dcrcwe3-2463111.pdf?src-supplier=Digi-Key, ComponentLink7Description=https://datasheet.ciiva.com/3256/dcrcwe3-3256009.pdf?src-supplier=Avnet, ComponentLink7URL=https://datasheet.ciiva.com/3256/dcrcwe3-3256009.pdf?src-supplier=Avnet, ComponentLink8Description=https://datasheet.ciiva.com/7777/1697337-7777194.pdf?src-supplier=Element14, ComponentLink8URL=https://datasheet.ciiva.com/7777/1697337-7777194.pdf?src-supplier=Element14, ComponentLink9Description=https://datasheet.ciiva.com/7777/1697337-7777195.pdf?src-supplier=Element14, ComponentLink9URL=https://datasheet.ciiva.com/7777/1697337-7777195.pdf?src-supplier=Element14, ComponentLink10Description=https://datasheet.ciiva.com/16881/dcrcwe3-16881548.pdf?src-supplier=Avnet+Europe, ComponentLink10URL=https://datasheet.ciiva.com/16881/dcrcwe3-16881548.pdf?src-supplier=Avnet+Europe, ComponentLink11Description=https://datasheet.ciiva.com/16199/dcrcwe3-16199070.pdf?src-supplier=Future+Electronics, ComponentLink11URL=https://datasheet.ciiva.com/16199/dcrcwe3-16199070.pdf?src-supplier=Future+Electronics, ComponentLink12Description=https://datasheet.ciiva.com/22674/1912744-22674687.pdf?src-supplier=Element14, ComponentLink12URL=https://datasheet.ciiva.com/22674/1912744-22674687.pdf?src-supplier=Element14, Composition="Thick Film", Contact Plating=Tin, Depth=0.5mm, Features="Automotive AEC-Q200", Height=0.35mm, Lead Free="Lead Free", Length=1mm, Military Standard=Not, Mount="Surface Mount", Number of Terminations=2, Packaging="Tape and Reel", Power Rating=63mW, Pricing 1="1=0,10000, 10=0,03800, 100=0,01540, 1000=0,00690, 2500=0,00599, 5000=0,00495 (USD)", Radiation Hardening=No, REACH SVHC=Unknown, Resistance=120R, RoHS=Yes, Stock 1=158664, Supplier 1=Digi-Key, Termination=SMD/SMT, Voltage Rating (DC)=50V, Weight=2.3E-05oz, Width=0.02inch, Working Voltage=50V
R133: library part Resistor, Case/Package=0402, Case Code (Metric)=1005, Manufacturer 1=Vishay, Manufacturer Part Number 1=CRCW0402300RFKED, Max Operating Temperature=155°C, Max Power Dissipation=63mW, Min Operating Temperature=-55°C, Package Quantity=10, Supplier Part Number 1=541-300LCT-ND, Temperature Coefficient=100ppm/°C, Tolerance=1%, Voltage Rating=50V, Case Code (Imperial)=0402, ComponentLink1Description=https://datasheet.ciiva.com/11809/0900766b80d98824-11809173.pdf?src-supplier=RSComponents, ComponentLink1URL=https://datasheet.ciiva.com/11809/0900766b80d98824-11809173.pdf?src-supplier=RSComponents, ComponentLink2Description=https://datasheet.ciiva.com/16394/dcrcwe3-16394469.pdf?src-supplier=Future+Electronics, ComponentLink2URL=https://datasheet.ciiva.com/16394/dcrcwe3-16394469.pdf?src-supplier=Future+Electronics, ComponentLink3Description=https://datasheet.ciiva.com/2464/dcrcwe3-2464423.pdf?src-supplier=Digi-Key, ComponentLink3URL=https://datasheet.ciiva.com/2464/dcrcwe3-2464423.pdf?src-supplier=Digi-Key, ComponentLink4Description=https://datasheet.ciiva.com/2464/dcrcwe3-2464424.pdf?src-supplier=Digi-Key, ComponentLink4URL=https://datasheet.ciiva.com/2464/dcrcwe3-2464424.pdf?src-supplier=Digi-Key, ComponentLink5Description=https://datasheet.ciiva.com/7690/1697337-7690664.pdf?src-supplier=Element14, ComponentLink5URL=https://datasheet.ciiva.com/7690/1697337-7690664.pdf?src-supplier=Element14, ComponentLink6Description=https://datasheet.ciiva.com/2464/dcrcwe3-2464425.pdf?src-supplier=Digi-Key, ComponentLink6URL=https://datasheet.ciiva.com/2464/dcrcwe3-2464425.pdf?src-supplier=Digi-Key, ComponentLink7Description=https://datasheet.ciiva.com/7690/1697337-7690665.pdf?src-supplier=Element14, ComponentLink7URL=https://datasheet.ciiva.com/7690/1697337-7690665.pdf?src-supplier=Element14, ComponentLink8Description=https://datasheet.ciiva.com/22675/1912744-22675083.pdf?src-supplier=Element14, ComponentLink8URL=https://datasheet.ciiva.com/22675/1912744-22675083.pdf?src-supplier=Element14, ComponentLink9Description=https://datasheet.ciiva.com/5547/dcrcwe3-109170-5547615.pdf?src-supplier=Mouser, ComponentLink9URL=https://datasheet.ciiva.com/5547/dcrcwe3-109170-5547615.pdf?src-supplier=Mouser, Composition="Thick Film", Contact Plating=Tin, Depth=0.5mm, Features="Automotive AEC-Q200", Height=0.35mm, Lead Free="Lead Free", Length=1mm, Military Standard=Not, Mount="Surface Mount", Number of Terminations=2, Packaging="Tape and Reel", Power Rating=63mW, Pricing 1="1=0,10000, 10=0,03800, 100=0,01540, 1000=0,00690, 2500=0,00599, 5000=0,00495 (USD)", Radiation Hardening=No, REACH SVHC=Unknown, Resistance=300R, RoHS=Yes, Stock 1=11043, Supplier 1=Digi-Key, Termination=SMD/SMT, Voltage Rating (DC)=50V, Weight=2.3E-05oz, Width=0.02inch
R137: library part Resistor, Case/Package=0402, Case Code (Metric)=1005, Manufacturer 1=Panasonic, Manufacturer Part Number 1=ERA-2AEB1961X, Max Operating Temperature=155°C, Max Power Dissipation=63mW, Min Operating Temperature=-55°C, Package Quantity=1, Supplier Part Number 1=P1.96KDCCT-ND, Temperature Coefficient=25ppm/°C, Tolerance=0.1%, Voltage Rating=25V, Voltage Rating (DC)=50V, Case Code (Imperial)=0402, ComponentLink1Description=https://datasheet.ciiva.com/24129/aoa0000ce26-24129630.pdf?src-supplier=Mouser, ComponentLink1URL=https://datasheet.ciiva.com/24129/aoa0000ce26-24129630.pdf?src-supplier=Mouser, Composition="Thin Film,Metal Film", Depth=0.5mm, Features="Automotive AEC-Q200", Height=0.016inch, Lead Free="Lead Free", Length=1mm, Military Standard=Not, Mount="Surface Mount", Number of Terminations=2, Packaging="Tape and Reel", Power Rating=63mW, Pricing 1="1=0,45000, 10=0,32100, 100=0,12830, 1000=0,06322, 2500=0,05858, 5000=0,05300 (USD)", REACH SVHC=Unknown, Resistance=1.96kR, RoHS=Yes, Stock 1=35392, Supplier 1=Digi-Key, Termination=SMD/SMT, Weight=2.8E-05oz, Width=0.02inch
R146 R148: library part Resistor, Case/Package=0402, Case Code (Metric)=1005, Manufacturer 1=Yageo, Manufacturer Part Number 1=RT0402BRD072K55L, Max Operating Temperature=125°C, Max Power Dissipation=63mW, Min Operating Temperature=-55°C, Package Quantity=10000, Power Rating=62.5mW, Supplier Part Number 1=YAG4233CT-ND, Temperature Coefficient=25ppm/°C, Tolerance=0.1%, Voltage Rating=50V, Case Code (Imperial)=0402, ComponentLink1Description=https://datasheet.ciiva.com/2582/pyu-rt-1-to-0-05-rohs-l-5-2582291.pdf?src-supplier=Digi-Key, ComponentLink1URL=https://datasheet.ciiva.com/2582/pyu-rt-1-to-0-05-rohs-l-5-2582291.pdf?src-supplier=Digi-Key, ComponentLink2Description=https://datasheet.ciiva.com/12725/pyu-rt-1-to-0-05-rohs-l-4-12725359.pdf?src-supplier=Mouser, ComponentLink2URL=https://datasheet.ciiva.com/12725/pyu-rt-1-to-0-05-rohs-l-4-12725359.pdf?src-supplier=Mouser, Composition="Thin Film", Height=0.014inch, Lead Free="Lead Free", Length=0.039inch, Number of Terminations=2, Packaging="Tape and Reel", Pricing 1="1=0,41000, 10=0,29200, 100=0,11690, 1000=0,05762, 2500=0,05338, 5000=0,04830 (USD)", Resistance=2.55kR, RoHS=Yes, Stock 1=13357, Supplier 1=Digi-Key, Termination=SMD/SMT, Voltage Rating (DC)=50V, Width=0.02inch
T1: "RF Transformer 1.414: 1 4Term. SMD", Case/Package=SMD/SMT, Current Rating=600mA, Manufacturer="TE Connectivity MA-COM", Max Operating Temperature=85°C, Min Operating Temperature=-40°C, Package Quantity=900, Power Rating=250mW, Supplier Part Number 1=1465-1304-1-ND, ComponentLink1Description=https://datasheet.ciiva.com/29655/maba-007681-ct2010-29655680.pdf?src-supplier=Digi-Key, ComponentLink1URL=https://datasheet.ciiva.com/29655/maba-007681-ct2010-29655680.pdf?src-supplier=Digi-Key, ComponentLink2Description=https://datasheet.ciiva.com/15154/getdatasheetpartid-721834-15154840.pdf?src-supplier=Verical, ComponentLink2URL=https://datasheet.ciiva.com/15154/getdatasheetpartid-721834-15154840.pdf?src-supplier=Verical, ComponentLink3Description=https://datasheet.ciiva.com/3296/maba-007681-ct2010-3296009.pdf?src-supplier=Avnet, ComponentLink3URL=https://datasheet.ciiva.com/3296/maba-007681-ct2010-3296009.pdf?src-supplier=Avnet, Depth=6.35mm, Height=3.33mm, Length=7.11mm, Manufacturer Part Number=MABA-007681-CT2010, Max DC Current=600mA, Mount="Surface Mount", Number of Pins=4, Packaging="Tape and Reel", Pricing 1="1 = 2,84000, 10 = 2,27000, 25 = 1,84480, 50 = 1,79740, 100 = 1,75010, 250 = 1,70280 (USD)", Radiation Hardening=No, RoHS=Yes, Stock 1=1606, Supplier 1=Digi-Key, Termination=SMD/SMT, Turns Ratio=1.414:1, Width=6.35mm
T2: "RF Transformer 1: 1CT 0.3MHz to 200MHz Surface Mount", Case/Package=SMD/SMT, Manufacturer 1="TE Connectivity MA-COM", Max DC Current=500mA, Max Operating Temperature=85°C, Min Operating Temperature=-40°C, Package Quantity=2000, Power Rating=500mW, Supplier Part Number 1=1465-1317-1-ND, ComponentLink1Description=https://datasheet.ciiva.com/3295/ds-mabaes0060-v5-3295936.pdf?src-supplier=Avnet, ComponentLink1URL=https://datasheet.ciiva.com/3295/ds-mabaes0060-v5-3295936.pdf?src-supplier=Avnet, ComponentLink2Description=https://datasheet.ciiva.com/29655/mabaes0060-v6-29655622.pdf?src-supplier=Digi-Key, ComponentLink2URL=https://datasheet.ciiva.com/29655/mabaes0060-v6-29655622.pdf?src-supplier=Digi-Key, ComponentLink3Description=https://datasheet.ciiva.com/4550/ds-mabaes0060-v5-14473-4550847.pdf?src-supplier=Mouser, ComponentLink3URL=https://datasheet.ciiva.com/4550/ds-mabaes0060-v5-14473-4550847.pdf?src-supplier=Mouser, ComponentLink4Description=https://datasheet.ciiva.com/29655/mabaes0060-v6-29655623.pdf?src-supplier=Digi-Key, ComponentLink4URL=https://datasheet.ciiva.com/29655/mabaes0060-v6-29655623.pdf?src-supplier=Digi-Key, ComponentLink5Description=https://datasheet.ciiva.com/29655/mabaes0060-v6-29655624.pdf?src-supplier=Digi-Key, ComponentLink5URL=https://datasheet.ciiva.com/29655/mabaes0060-v6-29655624.pdf?src-supplier=Digi-Key, Depth=3.81mm, Height=2.67mm, Insertion Loss=1.5dB, Lead/Base Style="Gull Wing", Lead Free="Lead Free", Length=3.81mm, Manufacturer Part Number 1=MABAES0060, Mount="Surface Mount", Number of Pins=5, Packaging="Tape and Reel", Pricing 1="1=2.44000, 10=1.95400, 25=1.58720, 50=1.54660, 100=1.50590, 250=1.46520, 500=1.45300, 1000=1.28612 (USD)", Radiation Hardening=No, RoHS=Yes, Stock 1=4134, Supplier 1=Digi-Key, Termination=SMD/SMT, Turns Ratio=1:1, Width=3.81mm
U1: Manufacturer="Analog Devices", Manufacturer Part Number=AD9690BCPZ-500, Max Operating Temperature=85°C, Max Supply Voltage=3.4V, Min Operating Temperature=-40°C, Min Supply Voltage=3.2V, Power Dissipation=1.5W, Supplier Part Number 1=AD9690BCPZ-500-ND, ComponentLink1Description=http://www.mouser.com/ds/2/609/AD9690-534148.pdf?src-supplier=Mouser, ComponentLink1URL=http://www.mouser.com/ds/2/609/AD9690-534148.pdf?src-supplier=Mouser, ComponentLink2Description=http://www.analog.com/media/en/technical-documentation/data-sheets/AD9690.pdf?src-supplier=Digi-Key, ComponentLink2URL=http://www.analog.com/media/en/technical-documentation/data-sheets/AD9690.pdf?src-supplier=Digi-Key, ComponentLink3Description=http://www.farnell.com/datasheets/2146909.pdf?src-supplier=Element14, ComponentLink3URL=http://www.farnell.com/datasheets/2146909.pdf?src-supplier=Element14, ComponentLink4Description=http://www.analog.com/media/en/technical-documentation/data-sheets/AD9690.pdf?src-supplier=Avnet, ComponentLink4URL=http://www.analog.com/media/en/technical-documentation/data-sheets/AD9690.pdf?src-supplier=Avnet, Differential Nonlinearity=0.5LSB, Integral Nonlinearity (INL)=2.5LSB, Interface=Serial, Lead Free="Lead Free", Mount="Surface Mount", Number of A/D Converters=1, Number of Bits=14, Number of Inputs=1, Number of Pins=64, Packaging=Tray, Pricing 1="1 = 199,64000, 10 = 191,20500, 25 = 186,98720 (USD)", REACH SVHC="No SVHC", Resolution=14b, RoHS=Yes, Sampling Rate=500MS/s, Stock 1=6, Supplier 1=Digi-Key, Supply Type=Single
U2: "ANALOG DEVICES   HMC472ALP4E   RF ATTENUATOR, 3.8GHZ, 5.5V, HQFN-24", Attenuation Value=31.5dB, Case/Package=SMD/SMT, Manufacturer="Analog Devices", Max Frequency=3.8GHz, Max Input Voltage=5.5V, Max Operating Temperature=85°C, Max Power Dissipation=560mW, Min Input Voltage=4.5V, Min Operating Temperature=-40°C, Operating Supply Voltage=5V, Package Quantity=50, Supplier Part Number 1=1127-3157-ND, ComponentLink1Description=http://www.mouser.com/ds/2/609/hmc472a-879296.pdf?src-supplier=Mouser, ComponentLink1URL=http://www.mouser.com/ds/2/609/hmc472a-879296.pdf?src-supplier=Mouser, ComponentLink2Description=http://www.analog.com/media/en/technical-documentation/data-sheets/hmc472a.pdf?src-supplier=Avnet+Asia, ComponentLink2URL=http://www.analog.com/media/en/technical-documentation/data-sheets/hmc472a.pdf?src-supplier=Avnet+Asia, ComponentLink3Description=http://www.farnell.com/datasheets/1868224.pdf?src-supplier=Element14, ComponentLink3URL=http://www.farnell.com/datasheets/1868224.pdf?src-supplier=Element14, ComponentLink4Description=https://www.hittite.com/content/documents/data_sheet/hmc472alp4.pdf?src-supplier=Avnet, ComponentLink4URL=https://www.hittite.com/content/documents/data_sheet/hmc472alp4.pdf?src-supplier=Avnet, ComponentLink5Description=https://www.analog.com/media/en/technical-documentation/data-sheets/hmc472a.pdf?src-supplier=Digi-Key, ComponentLink5URL=https://www.analog.com/media/en/technical-documentation/data-sheets/hmc472a.pdf?src-supplier=Digi-Key, Contact Plating=Tin,Matte, Impedance=50R, Insertion Loss=3dB, Lead Free="Contains Lead", Manufacturer Part Number=HMC472ALP4E, Max Supply Voltage=5.5V, Min Supply Voltage=4.5V, Mount="Surface Mount", Number of Bits=6, Number of Channels=1, Number of Pins=24, Packaging="Cut Tape", Pricing 1="1 = 7,47000, 10 = 6,84400, 25 = 6,22160, 100 = 5,59940, 250 = 5,13284, 500 = 4,66620, 1000 = 4,19958 (USD)", REACH SVHC="No SVHC", RoHS=Yes, Stock 1=867, Supplier 1=Digi-Key
U3: "IC MONITOR PWR/CURR BIDIR 10MSOP", Case/Package=VSSOP, Input Bias Current=10uA, Input Offset Voltage (Vos)=2.5uV, Manufacturer="Texas Instruments", Max Operating Temperature=125°C, Max Supply Voltage=5.5V, Min Operating Temperature=-40°C, Min Supply Voltage=2.7V, Nominal Supply Current=330uA, Output Current=10mA, Package Quantity=1, Supplier Part Number 1=296-29034-1-ND, Accuracy=0.02%, Common Mode Rejection Ratio=140dB, ComponentLink1Description=https://datasheet.ciiva.com/1939/ina226-1939633.pdf?src-supplier=Digi-Key, ComponentLink1URL=https://datasheet.ciiva.com/1939/ina226-1939633.pdf?src-supplier=Digi-Key, ComponentLink2Description=https://datasheet.ciiva.com/4875/sbos547-126280-4875559.pdf?src-supplier=Mouser, ComponentLink2URL=https://datasheet.ciiva.com/4875/sbos547-126280-4875559.pdf?src-supplier=Mouser, ComponentLink3Description=https://datasheet.ciiva.com/1939/ina226-1939634.pdf?src-supplier=Digi-Key, ComponentLink3URL=https://datasheet.ciiva.com/1939/ina226-1939634.pdf?src-supplier=Digi-Key, ComponentLink4Description=https://datasheet.ciiva.com/1939/ina226-1939635.pdf?src-supplier=Digi-Key, ComponentLink4URL=https://datasheet.ciiva.com/1939/ina226-1939635.pdf?src-supplier=Digi-Key, ComponentLink5Description=https://datasheet.ciiva.com/14196/ina226-14196741.pdf?src-supplier=Avnet, ComponentLink5URL=https://datasheet.ciiva.com/14196/ina226-14196741.pdf?src-supplier=Avnet, ComponentLink6Description=https://datasheet.ciiva.com/22693/1840205-22693516.pdf?src-supplier=Element14, ComponentLink6URL=https://datasheet.ciiva.com/22693/1840205-22693516.pdf?src-supplier=Element14, Contact Plating=Gold, Lead Free="Lead Free", Manufacturer Part Number=INA226AIDGSR, Mount="Surface Mount", Number of Pins=10, Packaging="Tape and Reel", Pricing 1="1 = 2,88000, 10 = 2,58900, 100 = 2,12100, 500 = 1,80554, 1000 = 1,52275 (USD)", Radiation Hardening=No, REACH SVHC="No SVHC", RoHS=Yes, Stock 1=62024, Supplier 1=Digi-Key
U4 U5: "IC I/O EXPANDER I2C 16B 28QFN", Case/Package=QFN, Frequency=1.7MHz, Manufacturer=Microchip, Max Operating Temperature=125°C, Min Operating Temperature=-40°C, Operating Supply Voltage=5.5V, Output Current=25mA, Package Quantity=1600, Power Dissipation=700mW, Supplier Part Number 1=MCP23017T-E/MLCT-ND, ComponentLink1Description=https://datasheet.ciiva.com/1780/21952b-1780757.pdf?src-supplier=Digi-Key, ComponentLink1URL=https://datasheet.ciiva.com/1780/21952b-1780757.pdf?src-supplier=Digi-Key, ComponentLink2Description=https://datasheet.ciiva.com/16454/filehandler-aspxddocname-en023709-16454263.pdf?src-supplier=Future+Electronics, ComponentLink2URL=https://datasheet.ciiva.com/16454/filehandler-aspxddocname-en023709-16454263.pdf?src-supplier=Future+Electronics, ComponentLink3Description=https://datasheet.ciiva.com/8128/21952b-8128584.pdf?src-supplier=Avnet, ComponentLink3URL=https://datasheet.ciiva.com/8128/21952b-8128584.pdf?src-supplier=Avnet, Contact Plating=Tin,Matte, Interface=I2C,Serial, Lead Free="Lead Free", Manufacturer Part Number=MCP23017T-E/ML, Max Frequency=1.7MHz, Number of Bits=16, Number of I/Os=16, Packaging="Tape and Reel", Pricing 1="1 = 1,45000, 25 = 1,21560, 100 = 1,10210 (USD)", RoHS=Yes, Stock 1=7016, Supplier 1=Digi-Key
U6: "1.7-5.5V 1MHZ IND TMP 8-SOIC-N", Manufacturer=Microchip, Supplier Part Number 1=AT24CM02-SSHM-TCT-ND, ComponentLink1Description=http://www.microchip.com/mymicrochip/filehandler.aspx?ddocname=en589710&src-supplier=Digi-Key, ComponentLink1URL=http://www.microchip.com/mymicrochip/filehandler.aspx?ddocname=en589710&src-supplier=Digi-Key, Manufacturer Part Number=AT24CM02-SSHM-T, Pricing 1="1 = 2,51000, 25 = 2,42040, 100 = 2,41540 (USD)", RoHS=No, Stock 1=24235, Supplier 1=Digi-Key